# Altium PCB Transmitter_PCB3.PcbDoc
Units mm, origin at the board's own origin, x right, y up, seen from the top; angles counter-clockwise.
Board outline 101.6 x 101.6 mm, 2 copper layers (Top Layer, Bottom Layer); 24 components, 20 nets, 81 pads, 22 vias.
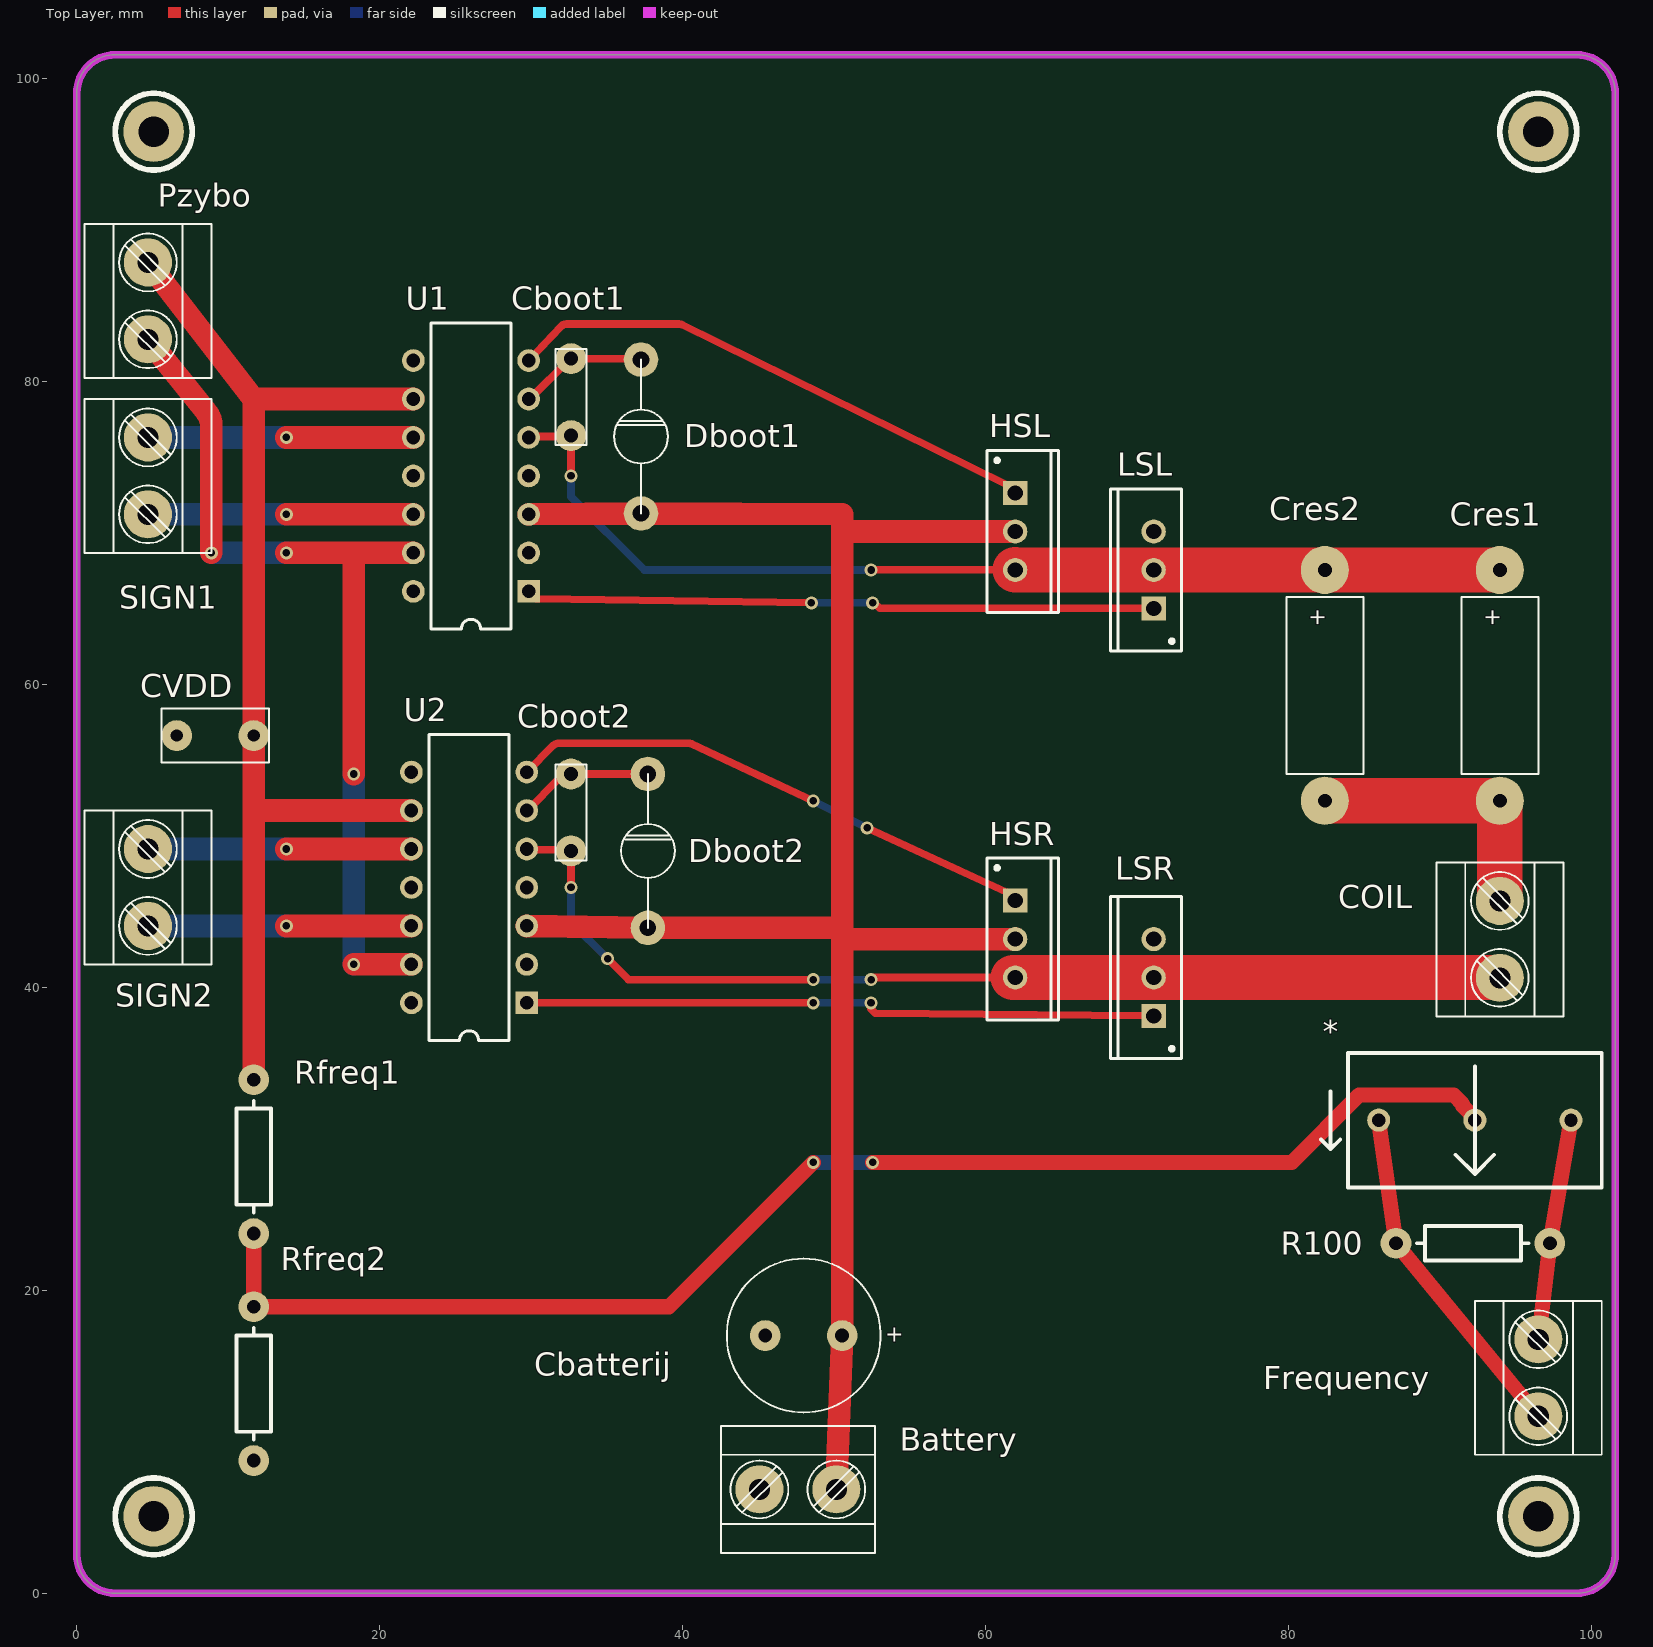
[diagram p0: Top Layer view]
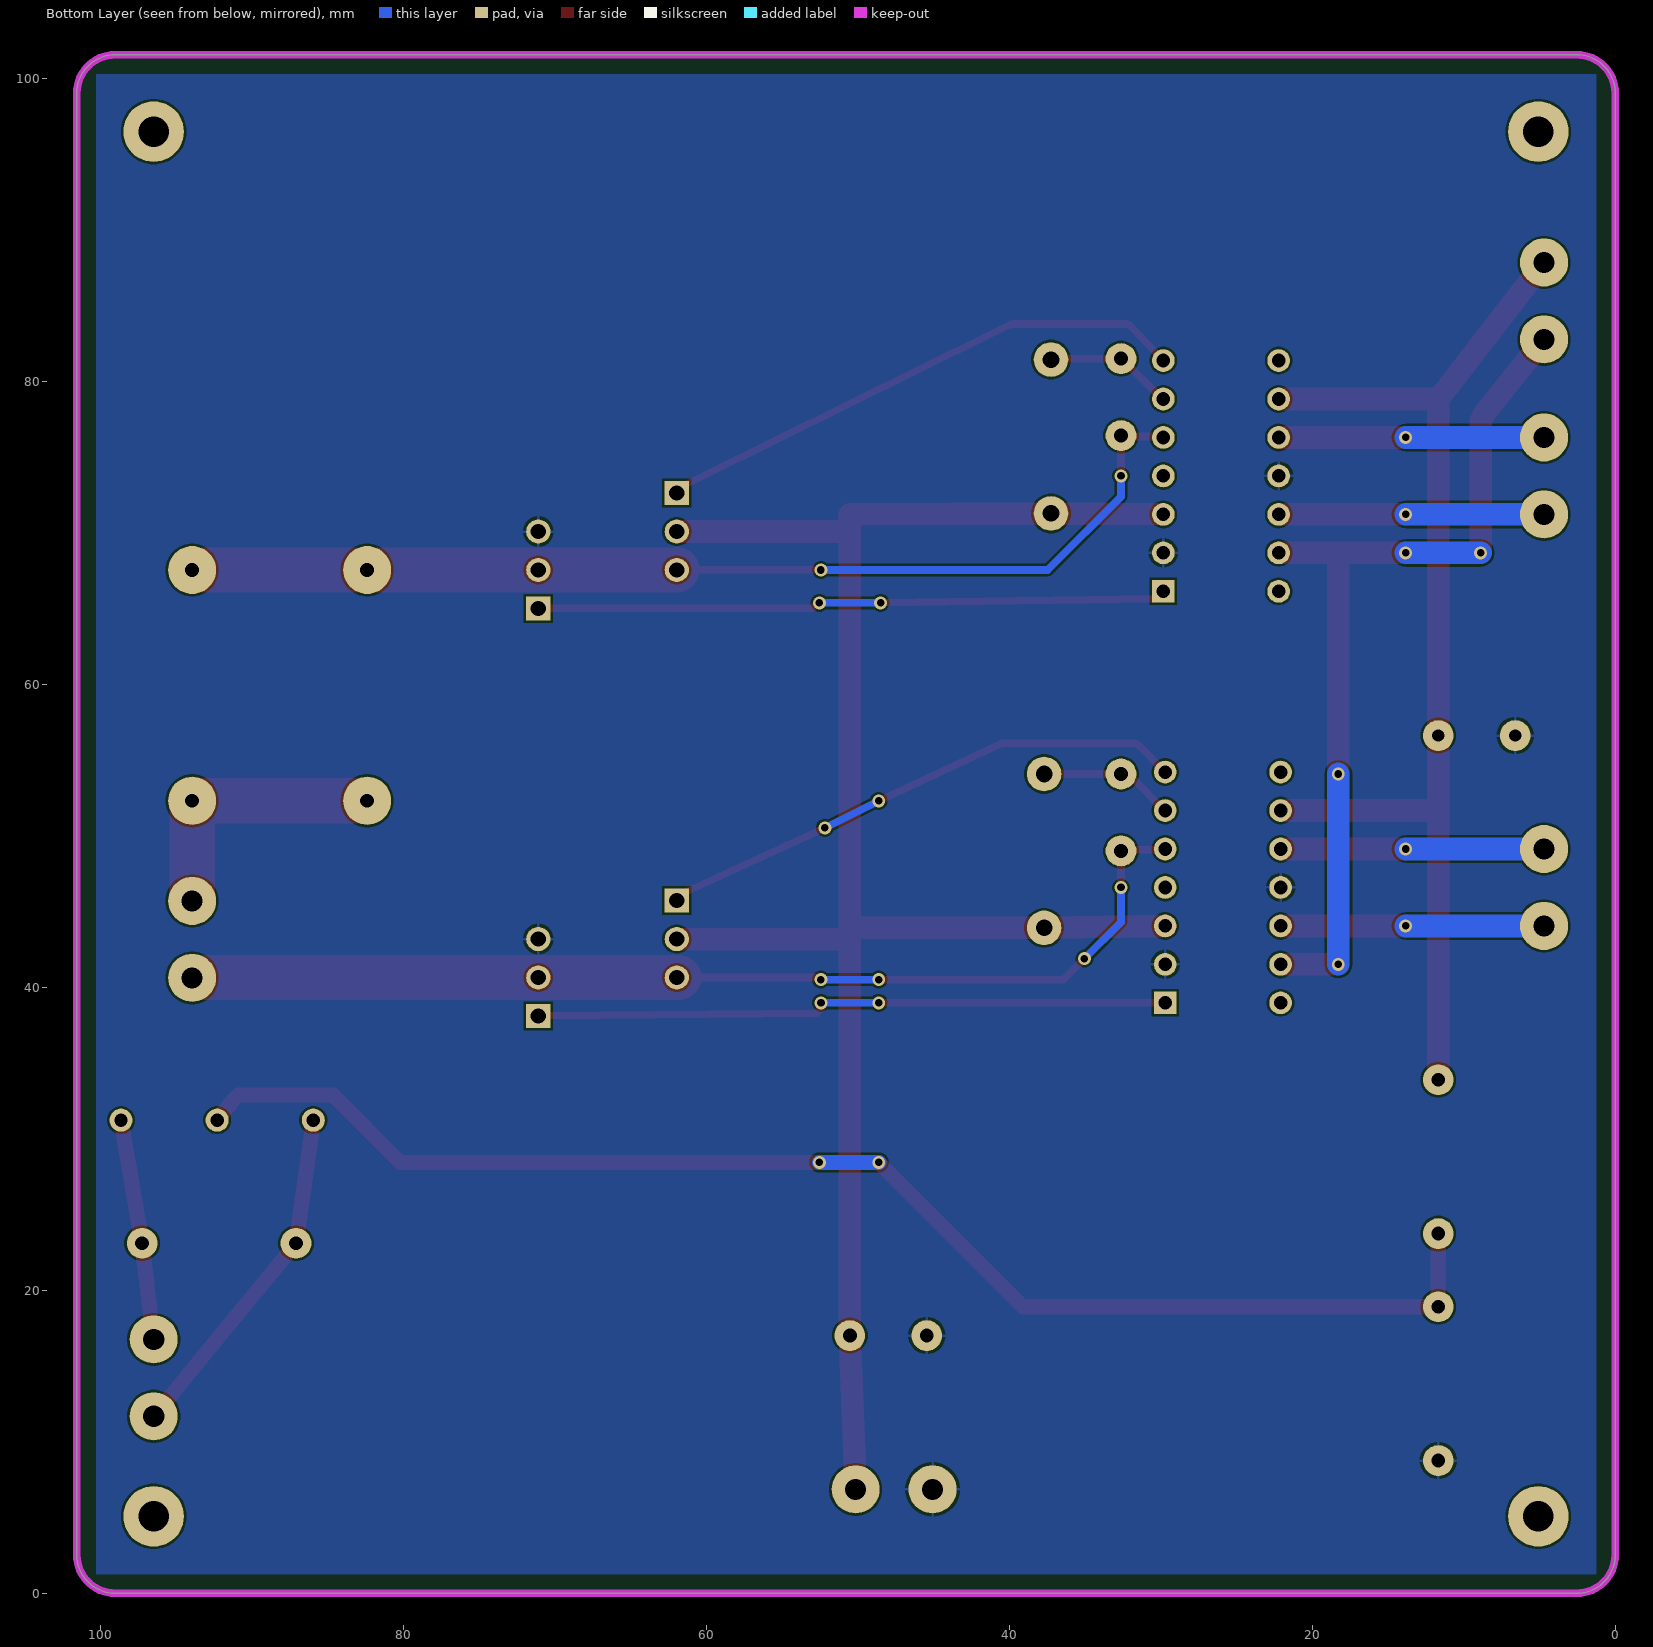
[diagram p1: Bottom Layer view, seen from below]

## Layer stack, top to bottom
Top Solder: solder mask 0.0102, Solder Resist, Dk 3.5
Top Layer: signal copper 0.0356
Dielectric 1: dielectric 0.32, FR-4, Dk 4.8
Bottom Layer: signal copper 0.0356
Bottom Solder: solder mask 0.0102, Solder Resist, Dk 3.5

## Board outline
0,2.54 0,99.06 cw(c2.54,99.06) 2.54,101.6 99.06,101.6 cw(c99.06,99.06) 101.6,99.06 101.6,2.54 cw(c99.06,2.54) 99.06,0 2.54,0 cw(c2.54,2.54)

## Design rules (kind name [scope] priority, off if disabled: settings)
BoardOutlineClearance [All] p1: gap=0.25 ignorepadtopadclearanceinfootprint=FALSE except(0: Arc-SplitContinuation Track-SplitContinuation SMDPad-SplitContinuation THPad-SplitContinuation Via-SplitContinuation Fill-SplitContinuation Poly-SplitContinuation Region-SplitContinuation Text-SplitContinuation)
Clearance Clearance-xPP-xTP-xTT [All] p1: gap=0.15 ignorepadtopadclearanceinfootprint=FALSE except(0: Arc-Hole Track-Hole SMDPad-Hole THPad-Hole Via-Hole Fill-Hole Poly-Hole Region-Hole Text-Hole)
ComponentClearance [All] p1: gap=0.25 collisioncheckmode=3 verticalgap=0.25 showdistances=FALSE
DiffPairsRouting [All] p1: maxlimit=0.25 minlimit=0.25 mostfreqgap=0.25 toplayer_minwidth=0.381 toplayer_maxwidth=0.381 toplayer_prefwidth=0.381 bottomlayer_minwidth=0.381 bottomlayer_maxwidth=0.381 bottomlayer_prefwidth=0.381 maxuncoupledlength=12.5
Height [All] p1: minheight=0 maxheight=25 prefheight=12.5
HoleSize HoleSize-PTH [All] p1: absolutevalues=TRUE maxlimit=2 minlimit=0.25 maxpercent=80.000 minpercent=20.000
HoleToHoleClearance [All] p1: gap=0.35 allowstackedmicrovias=TRUE
MinimumAnnularRing "Minimum IAR  >0.45mm" [((ObjectKind = 'Pad') OR (ObjectKind = 'Via')) And (Layer = 'MultiLayer') And (HoleDiameter > AsMM(0.45))] p1: minimumring=0.175 // minimum inner annular ring for pads > 0.45mm finished hole size
MinimumAnnularRing "Minimum IAR <=0.45mm" [((ObjectKind = 'Pad') OR (ObjectKind = 'Via')) And (Layer = 'MultiLayer') And (HoleDiameter <= AsMM(0.45))] p2: minimumring=0.175 // minimum inner annular ring for pads <= 0.45mm finished hole size
MinimumSolderMaskSliver [All] p1: minsoldermaskwidth=0.08
PlaneClearance PlaneClearance-IPI [All] p1: clearance=0.25
PlaneConnect [All] p1: planeconnectstyle=Relief reliefexpansion=0.175 reliefentries=4 reliefconductorwidth=0.2 reliefairgap=0.2
PolygonConnect PolygonConnect-xTW [All] p1: connectstyle=Relief reliefconductorwidth=0.2 reliefentries=4 polygonreliefangle="90 Angle" airgapwidth=0.2
RoutingCorners [All] p1: cornerstyle=45-Degree minsetback=2.5 maxsetback=2.5
RoutingVias "RoutingVias > 0.45mm" [(ObjectKind = 'Via') And (HoleDiameter > AsMM(0.45))] p1: holewidth=0.5 width=0.85 viastyle="Through Hole" minholewidth=0.5 minwidth=0.85 maxholewidth=0.9 maxwidth=1.25 // finishet hole size > 0.45mm
RoutingVias "RoutingVias <= 0.45mm" [(ObjectKind = 'Via') And (HoleDiameter <= AsMM(0.45))] p2: holewidth=0.3 width=0.65 viastyle="Through Hole" minholewidth=0.25 minwidth=0.6 maxholewidth=0.45 maxwidth=0.8 // finishet hole size <= 0.45mm
SilkToSilkClearance [All] p1: silktosilkclearance=0.2
SilkToSolderMaskClearance SilkscreenOverComponentPads [IsPad] p1: minsilkscreentomaskgap=0.2 clearancetoexposedcopper=TRUE
SolderMaskExpansion [All] p1: expansion=0 istentingtop=FALSE
SupplyNets "Schematic Supply Nets" [InNet('GND')] p1: voltage=0.000
UnRoutedNet [All] p1: checkbadconnections=TRUE
Width Width-xTW [All] p1: maxlimit=3 minlimit=0.2 preferedwidth=1.5
18 further rules are at their usual default settings.

## Components (designator, comment, footprint, x,y, rotation, side; value= is the part's Value field where it differs from the comment)
* "Component_1" PCBComponent_1 92.329,31.242 r270 top
Battery "CON CTB2P" "contactbrug 2" 47.625,6.858 r180 top (schematic designator POWERCON)
Cbatterij "CECR1000uF/25V" "cap 64 pol (D.4/.2/80/36)" 48.006,17.018 r180 top (schematic designator Cpower)
Cboot1 "CMTL100nF" "cap 1 (.25/.08/.2/80/36)" 32.639,78.994 r270 top (schematic designator Cb1)
Cboot2 "CMTL100nF" "cap 1 (.25/.08/.2/80/36)" 32.639,51.562 r270 top (schematic designator Cb2)
COIL "CON CTB2P" "contactbrug 2" 93.98,43.18 r270 top
Cres1 "CECA0.47uF/63V" "cap 48 pol (.46/.2/.6/125/36)" 93.98,59.955 r270 top
Cres2 "CECA0.47uF/63V" "cap 48 pol (.46/.2/.6/125/36)" 82.423,59.955 r270 top (schematic designator Cress2)
CVDD "CMKS2-100nF/100V" "cap 26 (.28/.14/.2/80/32)" 9.144,56.642 r0 top
Dboot1 "BYV27-100" SOD-57 37.261,76.391 r90 top (schematic designator DB1)
Dboot2 "BYV27-100" SOD-57 37.719,49.022 r90 top (schematic designator DB2)
Frequency "CON CTB2P" "contactbrug 2" 96.52,14.224 r270 top (schematic designator CONZYBO)
HSL "IRF540N" TO-220AB 61.976,70.115 r270 top
HSR "IRF540N" TO-220AB 61.976,43.202 r270 top
LSL "IRF540N" TO-220AB 71.12,67.575 r90 top
LSR "IRF540N" TO-220AB 71.12,40.662 r90 top
Pzybo "CON CTB2P" "contactbrug 2" 4.699,85.344 r270 top (schematic designator CTBPOWER)
R100 "100R" "ws 0.6W H" 92.202,23.114 r0 top
Rfreq1 "0R11" "ws 0.6W H" 11.684,28.829 r90 top
Rfreq2 "0R11" "ws 0.6W H" 11.684,13.843 r90 top
SIGN1 "CON CTB2P" "contactbrug 2" 4.699,73.787 r270 top (schematic designator CTBIN1)
SIGN2 "CON CTB2P" "contactbrug 2" 4.699,46.609 r270 top (schematic designator CTBIN2)
U1 "IR2110" PDIP14 26.035,73.787 r90 top
U2 "IR2110" PDIP14 25.908,46.609 r90 top

## Footprints (in the part's own frame and the unit in brackets; to place one, negate y for a bottom-side part, rotate by r counter-clockwise, add the part's x,y. Pads: shape width x height; smd on the part's side, far side on the other; paste and mask are expansions set on the pad)
"cap 1 (.25/.08/.2/80/36)" [mil]
  round 80 / inner round 60 / far side round 80 hole 36 paste-99999 mask+0: 1(-100,0) 2(100,0)
  silkscreen extent -125,-40 125,40
"cap 26 (.28/.14/.2/80/32)" [mil]
  round 80 / inner round 60 / far side round 80 hole 32 paste-99999 mask+0: 1(-100,0) 2(100,0)
  silkscreen extent -140,-70 140,70
"cap 48 pol (.46/.2/.6/125/36)" [mil]
  round 125 / inner round 60 / far side round 125 hole 36 paste-99999 mask+0: 1(-300,0) 2(300,0)
  silkscreen extent -230,-100 230,100
"cap 64 pol (D.4/.2/80/36)" [mil]
  round 80 / inner round 60 / far side round 80 hole 36 paste-99999 mask+0: 1(-100,0) 2(100,0)
  silkscreen extent -200,-200 200,200
"contactbrug 2" [mil]
  round 125 / inner round 60 / far side round 125 hole 55 paste-99999 mask+0: 1(-100,0) 2(100,0)
  silkscreen extent -200,-165 200,165
PCBComponent_1 [mil]
  round 60 hole 35: 0(0,250) 1(0,0) 2(0,-250)
  silkscreen extent -175,-400 175,330, body extent -175,-330 175,330, height 10
PDIP14 [mm] "DIP; 14 Leads; Row Spacing 7.62 mm; Pitch 2.54 mm"
  rect 1.5x1.5 hole 0.9: 1(-7.62,-3.81)
  round 1.5 hole 0.9: 2(-5.08,-3.81) 3(-2.54,-3.81) 4(0,-3.81) 5(2.54,-3.81) 6(5.08,-3.81) 7(7.62,-3.81) 8(7.62,3.81) 9(5.08,3.81) 10(2.54,3.81) 11(0,3.81) 12(-2.54,3.81) 13(-5.08,3.81) 14(-7.62,3.81)
  silkscreen extent -10.1,-2.65 10.1,2.65
SOD-57 [mil]
  round 90 / inner round 60 / far side round 90 hole 43 paste-99999 mask+0: 1(-200,0) 2(200,0)
  silkscreen extent -200,-70 200,70
TO-220AB [mm] "TO, Thru-Hole, Vertical, Heatsink Mounted; 3 In-Line Leads; Pitch 2.54 mm"
  rect 1.6x1.6 hole 1: 1(-2.54,0)
  round 1.6 hole 1: 2(0,0) 3(2.54,0)
  silkscreen extent -5.35,-1.85 5.35,2.85, body extent -5.4,-1.9 5.4,2.9, height 19.3
"ws 0.6W H" [mil]
  round 80 hole 36: 1(-200,0) 2(200,0)
  silkscreen extent -145,-45 145,45

## Part data
Battery COIL Frequency Pzybo SIGN1 SIGN2: "contactbrug vast 2 pin", Component Type=Standard, Part Number="CON CTB2P", Pin Count=2, Supplier 1=Farnell
Cbatterij: "elektrolytische condensator radiaal 1000uF/25V", Supplier 1=Farnell
Cboot1 Cboot2: "multilayer capaciteit 100nF/63V", Component Type=Standard, Part Number=CMTL100nF, Pin Count=2, Supplier 1=Farnell
Cres1 Cres2: "elektrolytische condensator axiaal 0.47uF/63V", Component Type=Standard, Part Number=CECA0.47uF/63V, Pin Count=2, Supplier 1=Farnell
CVDD: "gemetaliseerde polyester capaciteit 100nF/100V, Wima MKS2", Component Type=Standard, Part Number=CMKS2-100nF/100V, Pin Count=2, Supplier 1=Farnell
Dboot1 Dboot2: "ultra fast low-loss controlled avalanche rectifier", Component Type=Standard, Part Number=BYV27-100, Pin Count=2, Supplier 1=Farnell
HSL HSR LSL LSR: "HEXFET Power MOSFET", ComponentLink1Description="Manufacturer Link", ComponentLink1URL=http://www.irf.com/, ComponentLink2Description=Datasheet, ComponentLink2URL=http://www.irf.com/product-info/datasheets/data/irf540n.pdf, DatasheetVersion=May-1998, LatestRevisionDate=17-Jul-2002, LatestRevisionNote="Re-released for DXP Platform.", Note="Pin 2 is electrically connected to pin 4.", PackageDescription="TO, Thru-Hole, Vertical, Heatsink Mounted; 3 In-Line Leads; Pitch 2.54 mm", PackageReference=TO-220AB, PackageVersion=Feb-1997, Published=8-Jun-2000, Publisher="Altium Limited", Sim Note="Thermal Model provided is not called on from main Subckt."
R100: "weerstand 100R 0.6W", Supplier 1=Farnell
Rfreq1 Rfreq2: "weerstand 0R11 0.6W", Supplier 1=Farnell
U1 U2: "High and Low Side Driver", ComponentLink1Description="Manufacturer Link", ComponentLink1URL=http://www.irf.com/, ComponentLink2Description=Datasheet, ComponentLink2URL=http://www.irf.com/product-info/datasheets/data/ir2110.pdf, DatasheetVersion=PD60147J, LatestRevisionDate=04-Mar-2005, LatestRevisionNote="Stylized 3D Model Added.", Note="Pins 4, 8 and 14 are not connected", PackageDescription="DIP; 14 Leads; Row Spacing 7.62 mm; Pitch 2.54 mm", PackageReference=PDIP14, Published=8-Jun-2000, Publisher="Altium Limited"

## Free pads (board coordinates)
  round 4 hole 2: 1(5.08,5.08) 1(5.08,96.52) 1(96.52,5.08) 1(96.52,96.52)

## Via types
v1: diameter 0.85, hole 0.5, Top Layer to Bottom Layer, 22 vias

## Nets (pads, with @x,y where several pads share a name; then routed paths per layer and width w, separated by ;. In a path a pad name is that pad's centre, name@x,y a point inside that pad or via, vN(x,y) a via of type N, cw(c..) or ccw(c..) an arc to the next point about the centre after c; other vN are vias at no path point)
GND: Battery.2 Cbatterij.2 CVDD.1 LSL.3 LSR.3 Rfreq2.1 U1.2 U1.11 U2.2 U2.11
Net*_0: *.0 Frequency.1 R100.2 | length 14.6
  Top Layer w1: Frequency.1 R100.2 *.0
Net*_1: *.1 Rfreq1.1 Rfreq2.2 | length 92.1
  Top Layer w1: Rfreq1.1 Rfreq2.2 39.116,18.923 v1(48.641,28.448) ; v1(52.553,28.448) 80.236,28.448 84.681,32.893 90.932,32.893 91.522,32.303 91.522,32.191 92.329,31.384 *.1
  Bottom Layer w1: v1(48.641,28.448) v1(52.553,28.448)
Net*_2: *.2 Frequency.2 R100.1 | length 23
  Top Layer w1: *.2 R100.1 Frequency.2
NetCb1_1: Cboot1.1 Dboot1.2 U1.6 | length 8.5
  Top Layer w0.5: U1.6 29.909,78.867 32.575,81.534 Cboot1.1 Dboot1.2@37.261,81.534
NetCb1_2: Cboot1.2 Cres1.1 Cres2.1 HSL.3 LSL.2 U1.5 | length 70.2
  Top Layer w0.5: U1.5 29.909,76.391 32.575,76.391 Cboot1.2 v1(32.639,73.787) ; v1(52.458,67.575) 52.463,67.58 61.971,67.58 HSL.3@61.976,67.586
  Top Layer w3: HSL.3@61.976,67.586 LSL.2 Cres2.1 Cres1.1
  Bottom Layer w0.5: v1(32.639,73.787) 32.639,72.412 37.476,67.575 v1(52.458,67.575)
NetCb2_1: Cboot2.1 Dboot2.2 U2.6 | length 8.5
  Top Layer w0.5: U2.6 29.735,51.689 31.855,53.809 32.346,53.809 Cboot2.1 Dboot2.2@37.261,54.102
NetCb2_2: Cboot2.2 COIL.2 HSR.3 LSR.2 U2.5 | length 70.6
  Top Layer w0.5: U2.5 29.781,49.085 32.575,49.085 Cboot2.2 v1(32.639,46.609) ; v1(35.052,41.91) 36.438,40.524 v1(48.641,40.524) ; v1(52.458,40.524) 52.553,40.524 52.691,40.662 HSR.3@61.849,40.662
  Top Layer w3: HSR.3@61.849,40.662 LSR.2 COIL.2
  Bottom Layer w0.5: v1(32.639,46.609) 32.639,44.323 v1(35.052,41.91) ; v1(48.641,40.524) v1(52.458,40.524)
NetCOIL_1: COIL.1 Cres1.2 Cres2.2 | length 18.2
  Top Layer w3: Cres2.2 Cres1.2 COIL.1
NetCpower_1: Battery.1 Cbatterij.1 Dboot1.1 Dboot2.1 HSL.2 HSR.2 U1.3 U2.3 | length 128.8
  Top Layer w1.5: U2.3 Dboot2.1 50.546,43.942 ; U1.3 Dboot1.1 50.546,71.247 50.546,70.115 ; Battery.1 Cbatterij.1 50.546,43.18 ; HSR.2 50.546,43.18 ; HSL.2 50.546,70.115 ; 50.546,43.18 50.546,43.942 ; 50.546,43.942 50.546,70.115
NetCTBIN1_1: SIGN1.1 U1.10 | length 17.5
  Top Layer w1.5: v1(13.843,76.327) U1.10
  Bottom Layer w1.5: SIGN1.1 v1(13.843,76.327)
NetCTBIN1_2: SIGN1.2 U1.12 | length 17.5
  Top Layer w1.5: v1(13.843,71.247) U1.12
  Bottom Layer w1.5: SIGN1.2 v1(13.843,71.247)
NetCTBIN2_1: SIGN2.1 U2.10 | length 17.4
  Top Layer w1.5: v1(13.843,49.149) U2.10
  Bottom Layer w1.5: SIGN2.1 v1(13.843,49.149)
NetCTBIN2_2: SIGN2.2 U2.12 | length 17.4
  Top Layer w1.5: v1(13.843,44.069) U2.12
  Bottom Layer w1.5: SIGN2.2 v1(13.843,44.069)
NetCTBPOWER_1: CVDD.2 Pzybo.1 Rfreq1.2 U1.9 U2.9 | length 77.3
  Top Layer w1.5: Pzybo.1 11.684,78.867 ; Rfreq1.2 11.684,51.689 ; U2.9 11.684,51.689 ; U1.9 11.684,78.867 ; 11.684,51.689 CVDD.2 11.684,78.867
NetCTBPOWER_2: Pzybo.2 U1.13 U2.13 | length 59.9
  Top Layer w1.5: Pzybo.2 8.559,78.009 8.56,78.007 cw(c7.39,77.068) 8.89,77.068 v1(8.89,68.707) ; v1(13.843,68.707) 18.288,68.707 ; v1(18.288,41.529) U2.13 ; v1(18.288,54.102) 18.288,68.707 ; U1.13 18.288,68.707
  Bottom Layer w1.5: v1(8.89,68.707) v1(13.843,68.707) ; v1(18.288,41.529) v1(18.288,54.102)
NetHSL_1: HSL.1 U1.7 | length 35.8
  Top Layer w0.5: U1.7 31.983,83.664 cw(c32.346,83.32) 32.346,83.82 39.759,83.82 cw(c39.759,83.32) 39.98,83.769 61.426,73.205 HSL.1
NetHSR_1: HSR.1 U2.7 | length 35.5
  Top Layer w0.5: U2.7 31.477,55.988 cw(c31.83,55.634) 31.83,56.134 40.402,56.134 cw(c40.402,55.634) 40.614,56.087 v1(48.641,52.324) ; v1(52.197,50.546) 61.426,46.292 HSR.1
  Bottom Layer w0.5: v1(48.641,52.324) v1(52.197,50.546)
NetLSL_1: LSL.1 U1.1 | length 41.6
  Top Layer w0.5: U1.1 30.345,65.667 v1(48.514,65.405) ; v1(52.553,65.405) 52.647,65.405 53.017,65.035 LSL.1
  Bottom Layer w0.5: v1(48.514,65.405) v1(52.553,65.405)
NetLSR_1: LSR.1 U2.1 | length 41.9
  Top Layer w0.5: U2.1 v1(48.641,38.989) ; v1(52.451,38.989) 52.447,38.815 52.447,38.602 52.738,38.311 70.57,38.128 LSR.1
  Bottom Layer w0.5: v1(48.641,38.989) v1(52.451,38.989)
pads on no net: U1.4 U1.8 U1.14 U2.4 U2.8 U2.14

## Polygon pours and split planes (outlines as drawn)
GND on Bottom Layer "GND_L02_P000" (solid, pour order 0): 1.27,100.33 100.33,100.33 100.33,1.27 1.27,1.27

## Keep-outs
Keep-Out Layer:
  the board outline again, w0.508

## Silkscreen, mask and mechanical layers (free items; w line width, h text height)
Top Overlay:
  circle w0.381: c96.52,96.52 r2.54
  circle w0.381: c5.08,96.52 r2.54
  circle w0.381: c96.52,5.08 r2.54
  circle w0.381: c5.08,5.08 r2.54

## Text inside footprints (layer, text, board x,y; h text height)
Cbatterij: Top Overlay "+" at 54.61,17.526 h1.07 r180
Cres1: Top Overlay "+" at 93.04,65.035 h1.07 r270
Cres2: Top Overlay "+" at 81.483,65.035 h1.07 r270